# Altium PCB CC08-1(W305A)-V1.3.PcbDoc
Units mm, origin at the board's own origin, x right, y up, seen from the top; angles counter-clockwise.
Board outline 31.4 x 124 mm, 2 copper layers (Top Layer, Bottom Layer); 64 components, 39 nets, 237 pads, 0 vias.
Unrouted connection lines stored in the file: 4.
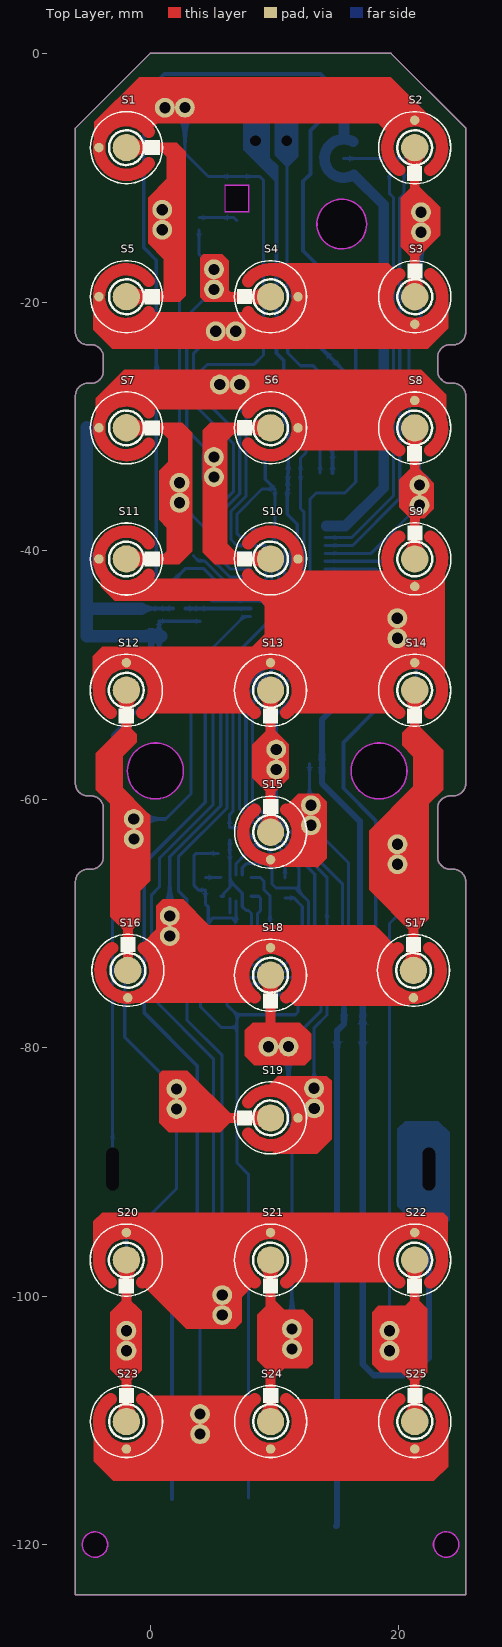
[diagram p0: Top Layer view]
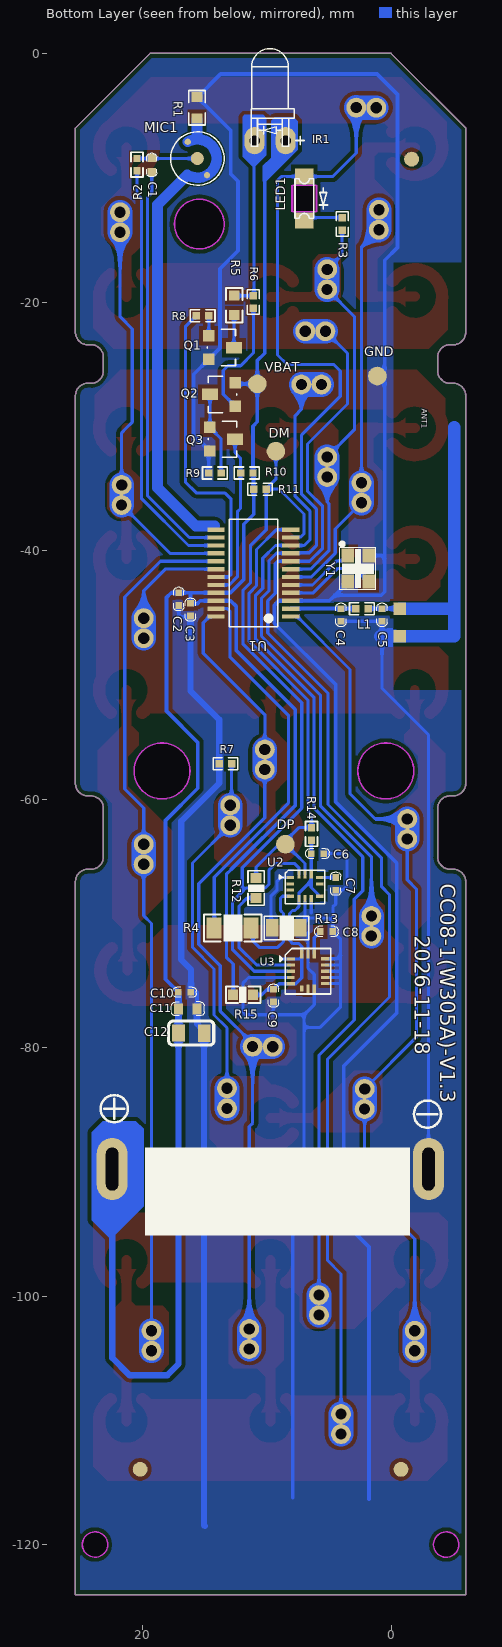
[diagram p1: Bottom Layer view, seen from below]

## Layer stack, top to bottom
Top Solder: solder mask 0.0102, Solder Resist, Dk 3.5
Top Layer: signal copper 0.0356
Dielectric 1: dielectric 0.32, FR-4, Dk 4.8
Bottom Layer: signal copper 0.0356
Bottom Solder: solder mask 0.0102, Solder Resist, Dk 3.5

## Board outline
-6,-66.64 cw(c-5,-66.64) -5,-65.64 -4.75,-65.64 ccw(c-4.75,-64.64) -3.75,-64.64 -3.75,-60.74 ccw(c-4.75,-60.74) -4.75,-59.74 -5,-59.74 cw(c-5,-58.74) -6,-58.74 -6,-27.54 cw(c-5,-27.54) -5,-26.54 -4.75,-26.54 ccw(c-4.75,-25.54) -3.75,-25.54 -3.75,-24.44 ccw(c-4.75,-24.44) -4.75,-23.44 -5,-23.44 cw(c-5,-22.44) -6,-22.44 -6,-6 0,0 19.4,0 25.4,-6 25.4,-22.44 cw(c24.4,-22.44) 24.4,-23.44 24.15,-23.44 ccw(c24.15,-24.44) 23.15,-24.44 23.15,-25.54 ccw(c24.15,-25.54) 24.15,-26.54 24.4,-26.54 cw(c24.4,-27.54) 25.4,-27.54 25.4,-58.74 cw(c24.4,-58.74) 24.4,-59.74 24.15,-59.74 ccw(c24.15,-60.74) 23.15,-60.74 23.15,-64.64 ccw(c24.15,-64.64) 24.15,-65.64 24.4,-65.64 cw(c24.4,-66.64) 25.4,-66.64 25.4,-124 -6,-124
cut-out: 22.806,-119.973 ccw(c23.826,-119.973) 23.826,-120.993 ccw(c23.826,-119.973) 24.846,-119.973 ccw(c23.826,-119.973) 23.826,-118.953 ccw(c23.826,-119.973)
cut-out: -5.446,-119.979 ccw(c-4.426,-119.979) -4.426,-120.999 ccw(c-4.426,-119.979) -3.406,-119.979 ccw(c-4.426,-119.979) -4.426,-118.959 ccw(c-4.426,-119.979)
cut-out: 16.18,-57.73 ccw(c18.43,-57.73) 18.43,-59.98 ccw(c18.43,-57.73) 20.68,-57.73 ccw(c18.43,-57.73) 18.43,-55.48 ccw(c18.43,-57.73)
cut-out: 0.43,-59.98 cw(c0.43,-57.73) -1.82,-57.73 cw(c0.43,-57.73) 0.43,-55.48 cw(c0.43,-57.73) 2.68,-57.73 cw(c0.43,-57.73)
cut-out: 15.43,-15.73 cw(c15.43,-13.73) 13.43,-13.73 cw(c15.43,-13.73) 15.43,-11.73 cw(c15.43,-13.73) 17.43,-13.73 cw(c15.43,-13.73)
cut-out: 5.999,-12.72 7.999,-12.72 7.999,-10.62 5.999,-10.62

## Design rules (kind name [scope] priority, off if disabled: settings)
Clearance Clearance_1 [All vs InNet('GND')] p1: gap=0.305 ignorepadtopadclearanceinfootprint=FALSE
Clearance [All] p2: gap=0.25 ignorepadtopadclearanceinfootprint=FALSE
PolygonConnect [All] p1: connectstyle=Direct reliefconductorwidth=0.254 reliefentries=4 polygonreliefangle="90 Angle" airgapwidth=0.254
RoutingVias [All] p1: holewidth=0.711 width=1.27 viastyle="Through Hole" minholewidth=0.711 minwidth=1.27 maxholewidth=0.711 maxwidth=1.27
SolderMaskExpansion [All] p1: expansion=0.102 istentingtop=FALSE
Width [All] p1: maxlimit=2 minlimit=0.1 preferedwidth=0.254
30 further rules are at their usual default settings.

## Components (designator, comment, footprint, x,y, rotation, side; value= is the part's Value field where it differs from the comment)
ANT1 "ANTENA" ANT_08 -0.688,-44.669 r180 bottom
C1 "4.7uF" 0402C#1 19.255,-8.446 r270 bottom
C2 "105" 0402C#2 17.091,-44.435 r90 bottom
C3 "105" 0402C#2 16.141,-45.286 r90 bottom
C4 "NC" 0402C#2 4.029,-45.705 r90 bottom
C5 "NC" 0402C#2 0.727,-45.705 r90 bottom
C6 "104" 0402C#2 6.446,-64.385 r180 bottom
C7 "104" 0402C#2 4.463,-66.287 r270 bottom
C8 "104" 0402C#2 5.719,-70.655 r180 bottom
C9 "104" 0402C#2 9.47,-75.286 r270 bottom
C10 "104" 0402C#2 17.143,-75.542 r180 bottom
C11 "22uF" 0603C 16.364,-76.883 r0 bottom
C12 "22uF" C0805 17.107,-78.816 r180 bottom
IR1 "IR_LED" LED 9.77,-6.985 r0 bottom
L1 "0R" 0402 2.357,-44.669 r180 bottom
LED1 "1206红色反贴" "PCBCOMPONENT_1 - DUPLICATE1" 6.985,-9.906 r270 top
MIC1 "4013" 4013 15.582,-8.468 r240 bottom
Q1 "S8050" SOT-23 14.679,-22.713 r270 bottom
Q2 "S8550" SOT-23 12.541,-28.395 r90 bottom
Q3 "S8050" SOT-23 14.59,-30.085 r270 bottom
R1 "0R" R0603#1 15.618,-4.375 r270 bottom
R2 "2K" 0402R 20.447,-8.953 r270 bottom
R3 "1K" 0402R 3.937,-13.716 r270 bottom
R4 "0R" R1206 12.754,-70.362 r180 bottom
R5 "3.3R" R0603#2 12.627,-20.265 r90 bottom
R6 "10K" 0402 11.079,-19.999 r270 bottom
R7 "470R" 0402 13.335,-57.15 r180 bottom
R8 "1K" 0402 15.163,-21.098 r180 bottom
R9 "1K" 0402 14.184,-33.759 r180 bottom
R10 "10K" 0402 11.614,-33.759 r0 bottom
R11 "4.7K" 0402 10.549,-35.052 r0 bottom
R12 "0R" R0603#2 10.867,-67.149 r270 bottom
R13 "0R" 0805R 8.425,-70.362 r180 bottom
R14 "4.7K" 0402R 6.405,-62.79 r270 bottom
R15 "0R" R0603#2 11.905,-75.739 r180 bottom
S1 "SW-PB" KINGFIGER_QIXIN2#1 -1.904,-7.572 r0 top
S2 "SW-PB" KINGFIGER_QIXIN2#2 21.3,-7.58 r270 top
S3 "SW-PB" KINGFIGER_QIXIN2#3 21.3,-19.58 r90 top
S4 "SW-PB" KINGFIGER_QIXIN2#4 9.7,-19.58 r180 top
S5 "SW-PB" KINGFIGER_QIXIN2#2 -1.904,-19.572 r0 top
S6 "SW-PB" KINGFIGER_QIXIN2#1 9.7,-30.13 r180 top
S7 "SW-PB" KINGFIGER_QIXIN2#1 -1.904,-30.122 r0 top
S8 "SW-PB" KINGFIGER_QIXIN2#2 21.3,-30.13 r270 top
S9 "SW-PB" KINGFIGER_QIXIN2#2 21.3,-40.68 r90 top
S10 "SW-PB" KINGFIGER_QIXIN2#1 9.7,-40.68 r180 top
S11 "SW-PB" KINGFIGER_QIXIN2#1 -1.904,-40.672 r0 top
S12 "SW-PB" KINGFIGER_QIXIN2#1 -1.9,-51.23 r270 top
S13 "SW-PB" KINGFIGER_QIXIN2#2 9.7,-51.23 r270 top
S14 "SW-PB" KINGFIGER_QIXIN2#2 21.3,-51.23 r270 top
S15 "SW-PB" KINGFIGER_QIXIN2#1 9.7,-62.667 r90 top
S16 "SW-PB" KINGFIGER_QIXIN2#1 -1.787,-73.78 r90 top
S17 "SW-PB" KINGFIGER_QIXIN2#2 21.193,-73.78 r90 top
S18 "SW-PB" KINGFIGER_QIXIN2#1 9.7,-74.16 r270 top
S19 "SW-PB" KINGFIGER_QIXIN2#1 9.7,-85.653 r180 top
S20 "SW-PB" KINGFIGER_QIXIN2#1 -1.9,-97.08 r270 top
S21 "SW-PB" KINGFIGER_QIXIN2#1 9.7,-97.08 r270 top
S22 "SW-PB" KINGFIGER_QIXIN2#1 21.3,-97.08 r270 top
S23 "SW-PB" KINGFIGER_QIXIN2#1 -1.9,-110.08 r90 top
S24 "SW-PB" KINGFIGER_QIXIN2#1 9.7,-110.08 r90 top
S25 "SW-PB" KINGFIGER_QIXIN2#1 21.3,-110.08 r90 top
U1 "W305A" SSOP24-0.635 7.215,-32.535 r90 bottom
U2 "LSM6DS3TR" BMI-160 8.425,-68.311 r180 bottom
U3 ".B" IC2530 5.293,-73.846 r180 bottom
Y1 "24MHZ_12PF_10ppm" 12MHZ_MINI_3225 3.465,-40.417 r180 bottom

## Footprints (in the part's own frame and the unit in brackets; to place one, negate y for a bottom-side part, rotate by r counter-clockwise, add the part's x,y. Pads: shape width x height; smd on the part's side, far side on the other; paste and mask are expansions set on the pad)
12MHZ_MINI_3225 [mil]
  rect 40x45 smd: 1(-1.45,0.52) 2(-1.45,-81.68) 3(65.05,-81.68) 4(65.05,0.62)
  silkscreen extent -26,-108 88,38
0402 [mm]
  rect 0.6x0.6 smd: 1(-0.5,0) 2(0.5,0)
  silkscreen extent -0.99,-0.48 0.99,0.48
0402C#1 [mil]
  rect 26x26 smd: 1(-0.91,-0.28) 2(43.09,-0.28)
  silkscreen extent -16,-16 58,16
0402C#2 [mil]
  rect 21x21 smd: 1(0.77,0.16) 2(40.78,0.16)
  silkscreen extent -16,-16 58,16
0402R [mm]
  rect 0.6x0.6 smd: 1(-0.5,0) 2(0.5,0)
  silkscreen extent -0.99,-0.48 0.99,0.48
0603C [mm]
  rect 0.7x0.9 smd: 1(-0.75,0) 2(0.75,0)
  silkscreen extent -1.33,-0.57 1.31,0.56
0805R [mm]
  rect 1x1.4 smd: 1(-1.126,0) 2(1.125,0)
  silkscreen extent -1.77,-0.96 1.79,0.95
4013 [mm]
  round 1.05 smd: 1(-0.016,0.002)
  round 0.5 smd: 2(-1.566,0.002) 2(1.534,0.002)
  Top Layer lines w0.85: -0.763,1.361 ccw(c-0.016,0.002) -1.42,0.661 ccw(c-0.016,0.002) -1.566,0.002 ; 1.534,0.002 cw(c-0.016,0.002) 1.171,-0.994 cw(c-0.016,0.002) 0.73,-1.356
  silkscreen extent -2.17,-2.15 2.13,2.15
ANT_08 [mm]
  rect 1x1 smd: 1(0,0) 2(0,-2.21)
  Top Layer lines w1: 4.394,14.605 4.394,0 ; 0,-2.21 4.394,-2.21 4.394,0 ; 0,0 4.394,0
BMI-160 [mm]
  rect 0.6x0.25 smd: 1(0.297,2.002) 2(0.297,1.499) 3(0.297,1.001) 4(0.297,0.498) 8(2.697,0.5) 10(2.697,1.499) 11(2.697,2.002)
  rect 0.25x0.6 smd: 5(1.001,0.292) 6(1.499,0.292) 7(1.999,0.292) 12(1.999,2.215) 13(1.499,2.215) 14(1.001,2.215)
  rect 0.6x0.25 on Bottom Overlay: 9(2.697,1.001)
  silkscreen extent -0.59,-0.09 3.1,2.61
C0805 [mil]
  rect 40x55 smd: 1(0,0) 2(81.1,-0.3)
  silkscreen extent -31,-38 112,38
IC2530 [mm]
  rect 0.7x0.25 smd: 1(-2.79,0.995) 2(-2.79,0.495) 3(-2.79,-0.005) 5(-2.79,-1.005) 9(0,-1) 10(0,-0.5) 11(0,0) 12(0,0.5) 13(0,1)
  rect 0.6x0.25 smd: 4(-2.79,-0.505)
  rect 0.25x0.5 smd: 6(-1.895,-1.4)
  rect 0.25x0.7 smd: 7(-1.395,-1.4) 8(-0.895,-1.4) 14(-0.895,1.39) 15(-1.395,1.39) 16(-1.895,1.39)
  silkscreen extent -3.67,-1.83 0.43,1.83
KINGFIGER_QIXIN2#1 [mm]
  round 2.2 smd: 1(0,0)
  round 0.762 smd: 2(-2.206,-0.003)
  Top Layer lines w1: 1.802,-1.262 cw(c0,0) 1.802,1.262
  silkscreen extent -2.89,-2.9 2.91,2.89
KINGFIGER_QIXIN2#2 [mm]
  round 2.2 smd: 1(0,0)
  round 0.762 smd: 2(-2.206,-0.003)
  Top Layer lines w1: 1.802,-1.262 cw(c0,0) -2.131,-0.547 cw(c0,0) 1.802,1.262
  silkscreen extent -2.89,-2.91 2.9,2.89
KINGFIGER_QIXIN2#3 [mm]
  round 2.2 smd: 1(0,0)
  round 0.762 smd: 2(-2.206,-0.003)
  Top Layer lines w1: 1.802,1.262 ccw(c0,0) -2.079,0.72 ccw(c0,0) -2.185,0.255 ccw(c0,0) -2.2,-0.003 ccw(c0,0) 1.802,-1.262
  silkscreen extent -2.89,-2.91 2.9,2.89
KINGFIGER_QIXIN2#4 [mm]
  round 2.2 smd: 1(0,0)
  round 0.762 smd: 2(-2.206,-0.003)
  Top Layer lines w1: 1.802,1.262 ccw(c0,0) 0.255,2.185 ccw(c0,0) -0.255,2.185 ccw(c0,0) 1.802,-1.262
  silkscreen extent -2.89,-2.9 2.91,2.89
LED [mm]
  oval 1.6x2.2 / inner round 1.4 / far side round 0 hole 0.85: 1(-1.284,0.033) 2(1.216,0.033)
  silkscreen extent -2.78,-7.38 1.48,0.47
"PCBCOMPONENT_1 - DUPLICATE1" [mm]
  rect 1.295x1.5 smd far side: 1(0,0) 2(3.539,0)
  Keep-Out Layer board cut-out: 0.688,-0.945 0.688,0.945 2.851,0.945 2.851,-0.945
  Keep-Out Layer lines w0.076: 2.851,-0.945 0.688,-0.945 0.688,0.945 2.851,0.945 2.851,-0.945
R0603#1 [mm]
  rect 0.806x0.864 smd paste-100 mask+0.051: 1(-0.853,0) 2(0.853,0)
  silkscreen extent -1.39,-0.66 1.39,0.66
R0603#2 [mm]
  rect 0.806x0.864 smd paste-100 mask+0.051: 1(-0.799,0) 2(0.798,0)
  silkscreen extent -1.39,-0.66 1.39,0.66
R1206 [mm]
  rect 1.208x1.701 smd paste-100 mask+0.051: 1(-1.479,0) 2(1.479,0)
  silkscreen extent -2.31,-1.08 2.31,1.08
SOT-23 [mil]
  rect 36x36 smd: 1(0,0) 2(74.94,0.05)
  rect 36x50 smd: 3(38,80)
  silkscreen extent -20,-5 95,85
SSOP24-0.635 [mm]
  rect 0.35x1.4 smd: 1.PA0(-12.769,0.872) 2.BTRF(-12.134,0.872) 3.VSS(-11.499,0.872) 4.XOSCI(-10.864,0.872) 5.XOSCO(-10.229,0.872) 6.PA15(-9.594,0.872) 7.PA14(-8.959,0.872) 8.PA13(-8.324,0.872) 9.PA12(-7.689,0.872) 10.PA11(-7.054,0.872) 11.DM(-6.419,0.872) 12.DP(-5.784,0.872) 13.AVSS(-5.784,6.872) 14.PA8(-6.419,6.872) 15.PA7(-7.054,6.872) 16.PA6(-7.689,6.872) 17.PA5(-8.324,6.872) 18.PA2(-8.959,6.872) 19.PB6(-9.594,6.872) 20.PB5(-10.229,6.872) 21.VPWR(-10.864,6.872) 22.IOVDD(-11.499,6.872) 23.PB2(-12.134,6.872) 24.PB1(-12.769,6.872)
  silkscreen extent -13.61,1.92 -4.95,5.82

## Part data
ANT1: "50欧天线"

## Free pads (board coordinates)
  round 1.2 smd far side: 0(-1.651,-8.509) 0(-0.793,-113.925) 0(20.193,-113.919)
  round 1.5 smd far side: 1(1.112,-25.956) 1(8.509,-63.627) 1(9.271,-32.004) 1(10.764,-26.591)
  round 0 / inner oval 2.2x4.5 / far side oval 2.5x5 hole 1 slot 3.45 at 90 deg: 21(-3.008,-89.763) 21(22.442,-89.763)
  round 1.6 hole 0.9: 265(-1.898,-104.385) 265(-1.299,-63.21) 265(0.987,-14.188) 265(1.592,-71.016) 265(2.13,-84.927) 265(2.384,-36.159) 265(2.806,-4.361) 265(4.035,-111.089) 265(5.145,-34.078) 265(5.147,-18.983) 265(5.811,-101.516) 265(6.901,-22.35) 265(7.223,-26.639) 265(10.165,-57.618) 265(11.14,-79.912) 265(11.419,-104.242) 265(12.943,-60.496) 265(13.203,-83.269) 265(19.273,-102.774) 265(19.904,-47.05) 265(19.906,-63.632) 265(21.679,-34.726) 265(21.806,-12.774) 266(-1.902,-102.774) 266(-1.303,-61.6) 266(0.983,-12.578) 266(1.196,-4.366) 266(1.587,-69.406) 266(2.126,-83.317) 266(2.38,-34.549) 266(4.031,-109.479) 266(5.14,-32.468) 266(5.143,-17.372) 266(5.291,-22.354) 266(5.612,-26.644) 266(5.806,-99.906) 266(9.53,-79.916) 266(10.16,-56.007) 266(11.415,-102.631) 266(12.948,-62.107) 266(13.208,-84.879) 266(19.278,-104.385) 266(19.899,-45.44) 266(19.91,-65.242) 266(21.683,-36.337) 266(21.81,-14.385)

## Nets (pads, with @x,y where several pads share a name; then routed paths per layer and width w, separated by ;. In a path a pad name is that pad's centre, name@x,y a point inside that pad or via, vN(x,y) a via of type N, cw(c..) or ccw(c..) an arc to the next point about the centre after c; other vN are vias at no path point)
AGND: MIC1.2 R1.2 U1.13.AVSS | length 36.9
  Bottom Layer w0.85: 14.193,-38.021 15.717,-38.021 18.796,-34.942 18.796,-12.183 16.392,-9.779 ; 14.785,-7.127 ccw(c15.588,-8.453) MIC1.2@14.813,-9.796 ; R1.2@15.618,-5.293 15.618,-6.807 15.72,-6.909
ANT: C4.2 L1.1 U1.2.BTRF | length 5.2
  Bottom Layer w0.3: L1.1 U1.2.BTRF
C0: pad.265@19.904,-47.05 pad.266@19.899,-45.44 S9.2 S10.2 S11.2 S12.2 S13.2 S14.2 U1.18.PA2 | length 64.6
  Top Layer w1: -1.936,-43.228 20.954,-43.228 S9.2@21.302,-42.88 ; S12.2 S13.2 S13.2@9.881,-49.023 ; S13.2@9.868,-49.036 S13.2@9.881,-49.023 ; S13.2@10.002,-48.902 S13.2@9.881,-49.023 ; 18.765,-47.843 18.765,-49.023 ; 18.89,-46.233 18.89,-43.233 ; 18.894,-47.843 18.894,-46.237 ; S14.2@21.414,-49.033 21.405,-49.023 S14.2 18.765,-49.023 ; S13.2@9.881,-49.023 18.765,-49.023
  Bottom Layer w0.25: U1.18.PA2 18.174,-41.494 19.899,-43.219 19.899,-45.44 19.899,-47.046 pad.265@19.904,-47.05
  Bottom Layer w2: pad.265@19.899,-47.05 pad.266@19.899,-45.44
C1: LED1.1 pad.265@1.592,-71.016 pad.265@2.806,-4.361 pad.266@1.196,-4.366 pad.266@1.587,-69.406 S1.2 S2.2 S16.2 S17.2 S18.2 U1.9.PA12 | length 128.8
  Top Layer w1: -1.682,-5.128 20.431,-5.128 20.753,-5.449 ; -0.031,-71.93 0.223,-71.676 17.531,-71.676 19.068,-73.213
  Bottom Layer w0.25: pad.266@1.587,-69.406 1.587,-64.634 5.693,-60.528 5.693,-51.621 10.426,-46.889 10.426,-43.836 9.826,-43.236 9.826,-40.814 9.223,-40.211 8.074,-40.211 8.037,-40.174 6.583,-40.174 6.012,-39.603 6.012,-36.643 7.225,-35.43 7.225,-30.726 4.095,-27.596 4.095,-25.556 4.632,-25.019 8.382,-25.019 9.136,-24.265 9.136,-10.207 8.835,-9.906 LED1.1 4.699,-9.906 2.806,-8.013 pad.265@2.806,-4.361
  Bottom Layer w2: pad.266@1.196,-4.366 2.802,-4.366 pad.265@2.806,-4.361 ; pad.265@1.587,-71.016 pad.266@1.587,-69.406
C2: pad.265@5.811,-101.516 pad.265@7.223,-26.639 pad.266@5.612,-26.644 pad.266@5.806,-99.906 S6.2 S7.2 S8.2 S20.2 S21.2 S22.2 U1.10.PA11 | length 131.4
  Top Layer w1: S20.2 S21.2 S22.2 ; -1.809,-27.861 20.87,-27.861 20.87,-27.972
  Bottom Layer w0.25: pad.265@5.809,-101.514 pad.265@5.811,-101.516 ; pad.266@5.809,-99.908 5.806,-99.906 5.806,-80.609 2.963,-77.765 2.963,-68.053 2.286,-67.376 2.286,-64.643 6.193,-60.736 6.193,-51.828 10.926,-47.096 10.926,-43.629 10.326,-43.028 10.326,-40.606 9.306,-39.587 U1.10.PA11@8.094,-39.587 ; pad.265@7.223,-26.639 7.223,-26.644 7.223,-28.638 7.725,-29.14 7.725,-35.637 6.512,-36.85 6.512,-39.108 6.994,-39.589 U1.10.PA11
  Bottom Layer w2: pad.266@5.612,-26.644 pad.265@7.223,-26.644 ; pad.265@5.809,-101.514 pad.266@5.809,-99.908
C3: pad.265@4.035,-111.089 pad.265@6.901,-22.35 pad.266@4.031,-109.479 pad.266@5.291,-22.354 S3.2 S4.2 S5.2 S23.2 S24.2 S25.2 U1.8.PA13 | length 149.9
  Top Layer w1: -2.032,-21.971 -1.488,-22.515 6.985,-22.515 7.714,-21.786 S3.2 S3.2@21.302,-21.78 ; S23.2 S24.2 S25.2
  Bottom Layer w0.25: pad.266@4.033,-109.479 4.033,-98.202 5.124,-97.111 5.124,-80.918 0.127,-75.922 0.127,-67.691 0.762,-67.056 0.762,-64.753 5.08,-60.435 5.08,-51.479 9.926,-46.633 9.926,-44.043 9.326,-43.443 9.326,-41.042 9.14,-40.857 U1.8.PA13@8.09,-40.857 ; pad.266@5.293,-22.352 5.291,-22.354 3.513,-24.132 3.513,-28.212 6.725,-31.424 6.725,-35.223 5.512,-36.436 5.512,-39.81 6.561,-40.859 U1.8.PA13 ; pad.265@6.899,-22.352 pad.265@6.901,-22.35
  Bottom Layer w2: pad.265@4.031,-111.089 pad.266@4.031,-109.479 ; pad.266@5.293,-22.352 pad.265@6.899,-22.352
C4: 
C5: 
GND: ANT1.2 C2.1 C3.1 C4.1 C5.1 C6.2 C7.2 C8.2 C9.2 C10.2 C11.1 C12.2 pad.1@1.112,-25.956 pad.21@-3.008,-89.763 Q1.2 Q3.2 R1.1 R7.1 R9.1 R13.1 R13.2 U1.3.VSS U2.1 U2.6 U2.7 U3.4 U3.8 U3.9 U3.10 U3.11 U3.12 U3.13 U3.15 Y1.2 Y1.4 | length 405.2
  Bottom Layer w0.25: pad.21@-3.008,-89.763 -3.008,-54.824 0.731,-51.085 0.731,-46.879 C5.1 C4.1 ; 4.148,-74.346 U3.10 ; 4.148,-73.846 U3.11 ; 4.148,-73.346 U3.12 ; U3.9 4.148,-74.846 4.064,-74.762 ; U3.13 4.359,-72.846 4.064,-72.551 ; C6.2@5.526,-64.362 3.71,-64.362 3.552,-64.52 3.552,-66.96 3.914,-67.322 C7.2 4.459,-68.446 4.684,-68.671 4.684,-69.948 ; 6.426,-69.163 U2.7 ; 6.688,-70.726 6.688,-72.02 6.688,-73.601 6.188,-74.101 U3.8 6.188,-76.531 7.001,-77.344 ; U2.6@6.926,-68.194 6.926,-68.444 6.924,-68.444 6.924,-69.153 6.927,-69.155 6.927,-69.864 6.614,-69.551 5.081,-69.551 4.684,-69.948 ; 7.915,-116.217 7.915,-90.178 7.001,-89.263 7.001,-78.359 ; U3.4 11.473,-74.351 11.905,-74.783 11.905,-77.122 11.684,-77.344 7.001,-77.344 ; U2.1 8.883,-66.309 9.172,-66.598 9.172,-67.296 9.652,-67.776 R13.1@9.652,-69.84 ; C9.2 9.466,-76.952 9.836,-77.322 ; 4.064,-74.762 4.064,-72.551 ; 4.064,-74.762 4.064,-76.708 5.715,-78.359 7.001,-78.359 ; 4.064,-72.551 4.064,-71.271 C8.2 4.684,-69.948 ; 7.001,-78.359 7.001,-77.344
  Bottom Layer w0.3: 1.778,-116.332 1.778,-96.024 3.81,-93.992 3.81,-81.465 -0.453,-77.202 -0.453,-65.148 4.445,-60.25 4.445,-50.8 9.401,-45.844 9.401,-44.418 9.022,-44.039 8.092,-44.039 U1.3.VSS 4.981,-44.034 4.54,-43.593 ; Y1.4 0.747,-40.401 0.508,-40.64 ; Y1.2 3.502,-42.555 4.54,-43.593 ; R9.1 14.684,-32.084 Q3.2 15.875,-30.702 15.875,-25.814 Q1.2 13.767,-23.706 13.767,-17.323 12.319,-15.875 12.319,-10.287 12.912,-9.694 12.912,-6.2 R1.1@15.589,-3.522 ; C11.1 15.614,-75.538 C10.2 ; R1.1 R1.1@15.589,-3.522 ; C3.1 16.218,-45.339 16.891,-45.339 17.095,-45.135 C2.1 ; 0.508,-40.64 0.508,-16.637 -0.508,-15.621 -0.508,-3.302 1.143,-1.651 13.718,-1.651 R1.1@15.589,-3.522 ; 0.508,-40.64 0.508,-43.307 0.794,-43.593 4.54,-43.593
  Bottom Layer w0.5: 14.986,-118.491 15.047,-118.43 C12.2 15.047,-78.633 15.305,-78.375 15.321,-78.375 15.614,-78.082 C11.1 ; C10.2 16.107,-73.697 16.891,-72.913 16.891,-61.767 13.835,-58.711 R7.1 13.835,-53.602 16.145,-51.292 C3.1
  Bottom Layer w1: ANT1.2 0.731,-46.879 0.889,-46.879
INT: R4.1 R4.2 U1.23.PB2 U2.4 | length 39.5
  Bottom Layer w0.25: U2.4 8.744,-67.813 8.89,-67.959 8.89,-68.975 8.664,-69.201 8.664,-71.464 9.131,-71.93 10.62,-71.93 11.109,-71.441 11.109,-70.528 R4.2 ; U1.23.PB2 13.173,-44.669 12.976,-44.866 12.976,-48.556 8.243,-53.288 8.243,-60.286 14.232,-66.275 R4.1
IR_1: Q1.3 R5.1 | length 2.6
  Bottom Layer w0.25: R5.1 12.647,-21.084 Q1.3
IR_LED2: IR1.2 R5.2 R6.1 | length 13.6
  Bottom Layer w0.25: IR1.2@10.992,-7.521 11.036,-7.565 11.036,-19.455 R6.1 12.593,-19.499 R5.2 R5.2
IR_RECE: Q3.3 R10.2 U1.20.PB5 | length 13.3
  Bottom Layer w0.25: Q3.3 12.558,-32.117 12.114,-32.56 R10.2 12.114,-36.611 12.376,-36.872 12.376,-42.113 13.027,-42.764 U1.20.PB5
IR_SEND: R8.1 U1.19.PB6 | length 25.3
  Bottom Layer w0.25: U1.19.PB6 13.099,-42.129 12.876,-41.905 12.876,-35.874 13.396,-35.354 15.688,-35.354 16.558,-34.484 16.558,-21.993 R8.1
IREF: Q1.1 R8.2 | length 1.6
  Bottom Layer w0.25: R8.2 14.663,-22.697 Q1.1
LEDG: 
LEDG-1: 
LEDR: 
LEDR-1: LED1.2 R3.1 | length 3.1
  Bottom Layer w0.25: R3.1 6.756,-13.216 LED1.2
MIC_BIAS: R2.2 U1.15.PA7 | length 34.1
  Bottom Layer w0.25: U1.15.PA7 16.308,-39.589 20.096,-35.801 20.096,-11.654 20.447,-11.303 R2.2
MIC_BIAS_1: C1.1 MIC1.1 R2.1 | length 4.9
  Bottom Layer w0.25: MIC1.1 R2.1
MIC_IN: C1.2 U1.14.PA8 | length 33.1
  Bottom Layer w0.25: U1.14.PA8 16.236,-38.954 19.596,-35.594 19.596,-11.595 19.262,-11.261 C1.2
NetANT1_1: ANT1.1 C5.2 L1.2 | length 2.5
  Bottom Layer w0.3: ANT1.1 C5.2 L1.2
Q1-1: Q2.1 R6.2 | length 9.9
  Bottom Layer w0.25: R6.2 11.079,-24.098 12.108,-25.126 13.122,-25.126 13.509,-25.513 13.509,-27.427 Q2.1
Q1-3: Q2.3 Q3.1 R9.2 | length 6.8
  Bottom Layer w0.25: R9.2 13.684,-30.991 Q3.1 14.573,-30.085 Q2.3 Q2.3@14.524,-27.479
R0: pad.265@19.273,-102.774 pad.265@19.906,-63.632 pad.266@19.91,-65.242 pad.266@19.278,-104.385 S14.1 S17.1 S22.1 S25.1 U1.17.PA5 | length 112.2
  Top Layer w0.8: 19.246,-103.58 21.3,-103.58 ; 19.273,-64.437 21.193,-64.437 ; S17.1 21.193,-64.437 ; S25.1 21.3,-103.58 ; S22.1 21.3,-103.58 ; S14.1 21.3,-54.907 22.378,-55.985 22.378,-59.096 21.193,-60.281 21.193,-64.437
  Bottom Layer w0.25: U1.17.PA5 18.555,-40.859 21.432,-43.736 21.432,-59.182 19.906,-60.708 19.906,-63.632 pad.265@19.908,-63.634 ; pad.265@19.273,-102.774 pad.265@19.275,-102.777 ; pad.266@19.278,-104.385 19.275,-104.383 pad.265@19.275,-102.777 ; pad.266@19.906,-65.242 19.906,-69.375 19.275,-70.006 19.275,-79.502 19.275,-102.774 pad.265@19.275,-102.777 ; pad.266@19.908,-65.24 pad.266@19.91,-65.242
  Bottom Layer w2: pad.266@19.275,-104.385 pad.265@19.275,-102.777 ; pad.266@19.908,-65.24 pad.265@19.908,-63.634
R1: pad.265@21.679,-34.726 pad.265@21.806,-12.774 pad.266@21.81,-14.385 pad.266@21.683,-36.337 S2.1 S3.1 S8.1 S9.1 U1.16.PA6 | length 56.1
  Top Layer w0.8: S9.1 S8.1 ; S3.1 S2.1
  Bottom Layer w0.25: U1.16.PA6 17.796,-40.224 pad.266@21.683,-36.337 ; pad.265@21.683,-34.726 21.683,-30.525 21.298,-30.14 20.828,-29.67 20.828,-22.166 21.806,-21.189 pad.266@21.806,-14.385
  Bottom Layer w2: pad.266@21.679,-36.337 pad.265@21.679,-34.726 ; pad.266@21.806,-14.385 pad.265@21.806,-12.774
R2: pad.265@2.13,-84.927 pad.265@-1.299,-63.21 pad.265@-1.898,-104.385 pad.266@2.126,-83.317 pad.266@-1.303,-61.6 pad.266@-1.902,-102.774 S12.1 S16.1 S19.1 S20.1 S23.1 U1.1.PA0 | length 114.3
  Top Layer w0.8: S23.1 S20.1 ; S12.1 -1.9,-55.13 -3.333,-56.563 -3.333,-58.722 -1.787,-60.268 S16.1 ; pad.265@2.001,-84.757 2.103,-84.757 2.999,-85.653 S19.1
  Bottom Layer w0.25: pad.266@-1.902,-102.774 -1.902,-95.391 2.128,-91.361 pad.265@2.128,-84.927 ; pad.266@-1.303,-61.6 1.265,-61.6 3.302,-59.563 3.302,-49.564 7.562,-45.304 U1.1.PA0 ; -0.468,-62.952 -1.04,-62.952 -1.299,-63.21 -1.299,-66.493 -2.032,-67.227 -2.032,-79.159 pad.266@2.023,-83.214 ; pad.266@2.024,-83.213 pad.266@2.128,-83.317
  Bottom Layer w2: pad.265@-1.902,-104.385 pad.266@-1.902,-102.774 ; pad.266@-1.303,-61.6 -1.303,-63.206 pad.265@-1.299,-63.21 ; pad.265@2.126,-84.927 pad.266@2.126,-83.317
R3: pad.265@0.987,-14.188 pad.265@2.384,-36.159 pad.266@0.983,-12.578 pad.266@2.38,-34.549 S1.1 S5.1 S7.1 S11.1 U1.6.PA15 | length 71.6
  Top Layer w0.8: S11.1 1.255,-40.672 2.382,-39.545 2.382,-31.163 1.341,-30.122 S7.1 ; S5.1 1.437,-19.572 2.001,-19.008 2.001,-8.304 1.269,-7.572 S1.1
  Bottom Layer w0.25: pad.265@0.983,-14.188 2.382,-15.588 2.382,-35.354 2.384,-35.356 pad.265@2.384,-35.778 ; pad.265@0.987,-14.188 pad.265@1.001,-14.202 ; pad.265@2.384,-36.159 4.493,-38.268 4.493,-40.206 6.417,-42.129 U1.6.PA15
  Bottom Layer w2: pad.265@0.983,-14.188 pad.266@0.983,-12.578 ; pad.265@2.38,-36.159 pad.266@2.38,-34.549
R4: pad.265@5.145,-34.078 pad.265@5.147,-18.983 pad.266@5.14,-32.468 pad.266@5.143,-17.372 R3.2 S4.1 S6.1 S10.1 U1.7.PA14 | length 56.1
  Top Layer w0.8: pad.266@5.143,-17.372 5.143,-18.979 5.147,-18.983 5.364,-18.983 5.96,-19.58 S4.1 ; S10.1 6.692,-40.68 5.387,-39.375 5.387,-31.145 6.402,-30.13 S6.1
  Bottom Layer w0.25: R3.2 3.937,-16.167 pad.266@5.143,-17.372 ; pad.266@5.14,-32.468 2.958,-30.286 2.958,-21.172 pad.265@5.147,-18.983 ; pad.265@5.145,-34.078 5.145,-36.096 5.012,-36.229 5.012,-40.017 6.489,-41.494 U1.7.PA14
  Bottom Layer w2: pad.265@5.145,-34.078 pad.266@5.145,-32.468 ; pad.265@5.145,-18.983 pad.266@5.145,-17.372
R5: pad.265@10.165,-57.618 pad.265@11.14,-79.912 pad.265@11.419,-104.242 pad.266@9.53,-79.916 pad.266@10.16,-56.007 pad.266@11.415,-102.631 S13.1 S15.1 S18.1 S21.1 S24.1 U1.24.PB1 | length 97.5
  Top Layer w0.8: 9.685,-78.194 9.687,-78.196 ; pad.266@9.687,-79.802 pad.266@9.689,-79.804 ; S24.1 S21.1 ; pad.266@9.7,-79.804 S18.1 ; S15.1 S13.1
  Bottom Layer w0.25: pad.265@10.162,-57.615 10.165,-57.618 10.165,-61.5 15.475,-66.81 15.475,-71.673 13.745,-73.404 13.745,-77.06 11.14,-79.665 11.14,-79.912 11.14,-79.916 11.14,-86.07 11.415,-86.345 pad.266@11.415,-102.631 ; pad.266@10.162,-56.009 10.16,-56.007 10.16,-53.213 15.113,-48.26 15.113,-45.805 14.612,-45.304 U1.24.PB1
  Bottom Layer w2: pad.266@9.53,-79.916 pad.265@11.14,-79.916 ; pad.265@10.162,-57.615 pad.266@10.162,-56.009 ; pad.265@11.415,-104.242 pad.266@11.415,-102.631
REGO: C7.1 U2.11 | length 1.3
  Bottom Layer w0.25: C7.1 4.462,-66.309 U2.11
REGOU: C8.1 U3.14 | length 2
  Bottom Layer w0.25: C8.1 6.188,-71.139 U3.14
RGND: pad.265@12.943,-60.496 pad.265@13.203,-83.269 pad.266@12.948,-62.107 pad.266@13.208,-84.879 R7.2 S15.2 S19.2 | length 31.9
  Top Layer w1: 11.486,-60.762 pad.265@12.955,-60.762 ; 11.557,-61.341 11.74,-61.524
  Bottom Layer w0.25: R7.2 12.835,-60.388 pad.265@12.943,-60.496 ; pad.266@12.948,-62.107 15.982,-65.142 15.982,-71.929 14.245,-73.667 14.245,-77.365 13.208,-78.402 pad.265@13.208,-83.269 ; pad.265@13.203,-83.269 pad.265@13.206,-83.271 ; pad.266@13.206,-84.877 pad.266@13.208,-84.879
  Bottom Layer w1: pad.265@12.943,-60.496 pad.265@12.945,-60.499 ; pad.266@12.945,-62.105 pad.266@12.948,-62.107
  Bottom Layer w2: pad.266@12.945,-62.105 pad.265@12.945,-60.499 ; pad.266@13.206,-84.877 pad.265@13.206,-83.271
SCL: pad.1@8.509,-63.627 R12.1 R12.2 R14.1 U1.12.DP U2.13 U3.2 | length 47.9
  Bottom Layer w0.25: U2.13 6.927,-65.183 7.674,-64.435 7.701,-64.435 pad.1@8.509,-63.627 ; U3.2 10.317,-73.351 10.816,-73.351 12.254,-71.913 12.254,-68.633 11.568,-67.947 R12.2 ; U1.12.DP 9.236,-38.319 10.826,-39.909 10.826,-42.821 11.426,-43.422 11.426,-47.303 6.693,-52.035 6.693,-60.96 6.405,-61.249 R14.1 7.426,-62.29 8.636,-63.5 pad.1@8.509,-63.627 ; R12.1 10.867,-65.477 9.256,-63.866 8.748,-63.866 pad.1@8.509,-63.627
SDA: pad.1@9.271,-32.004 R11.1 U1.11.DM U2.14 U3.3 | length 64.2
  Bottom Layer w0.25: U2.14 7.424,-65.518 7.756,-65.187 9.307,-65.187 9.813,-65.693 9.813,-66.83 10.132,-67.149 11.682,-67.149 11.98,-67.447 ; U1.11.DM 8.037,-38.904 7.267,-38.904 7.012,-38.65 7.012,-37.057 9.017,-35.052 R11.1 ; U3.3@8.308,-73.851 11.023,-73.851 12.754,-72.12 12.754,-68.22 11.98,-67.447 ; pad.1@9.271,-32.004 9.271,-34.274 R11.1 ; R11.1 10.049,-38.322 11.326,-39.599 11.326,-42.614 11.926,-43.215 11.926,-47.51 7.193,-52.243 7.193,-60.72 11.98,-65.507 11.98,-67.447
VBAT: C2.2 C3.2 C6.1 C9.1 C10.1 C11.2 C12.1 IR1.1 pad.1@10.764,-26.591 pad.21@22.442,-89.763 Q2.2 R10.1 R11.2 R14.2 R15.1 R15.2 U1.21.VPWR U1.22.IOVDD U2.5 U2.8 U2.12 U3.1 U3.5 U3.16 | length 191.5
  Bottom Layer w0.25: U2.8 5.903,-67.81 5.903,-67.627 6.426,-67.103 6.426,-66.566 ; R14.2 6.416,-63.301 6.416,-64.37 C6.1 U2.12 6.426,-66.566 ; U3.16 U3.16@7.188,-72.681 ; U3.16@7.188,-72.231 7.188,-71.856 7.416,-71.628 7.904,-71.628 8.164,-71.368 8.164,-69.197 7.929,-68.961 7.732,-68.961 7.424,-68.654 U2.5 7.424,-67.564 6.426,-66.566 ; 8.872,-72.851 U3.1 7.358,-72.851 U3.16@7.188,-72.681 ; R15.2 10.402,-75.739 9.971,-75.308 9.468,-75.308 C9.1 9.012,-74.851 U3.5 7.664,-74.851 7.188,-74.375 U3.16@7.188,-72.681 ; R15.1 12.704,-75.598 12.704,-73.268 13.254,-72.719 13.254,-66.038 12.845,-65.63
  Bottom Layer w0.3: IR1.1@8.492,-7.521 8.492,-7.676 8.867,-8.05 8.867,-8.105 10.17,-9.408 10.17,-24.119 10.764,-24.713 pad.1@10.764,-26.591 ; Q2.2 12.443,-26.591 pad.1@10.764,-26.591 ; 12.845,-65.63 7.718,-60.503 7.718,-52.798 12.451,-48.065 12.451,-44.51 12.927,-44.034 U1.22.IOVDD 15.361,-44.034 15.577,-44.251 C3.2 16.145,-43.479 16.225,-43.399 ; C10.1@17.123,-75.521 17.14,-75.521 17.24,-75.421 17.24,-75.405 18.154,-74.49 18.154,-61.715 15.56,-59.121 15.56,-55.433 18.077,-52.916 18.077,-43.781 17.695,-43.399 16.225,-43.399 ; pad.1@10.764,-26.591 10.764,-29.639 11.114,-29.989 R10.1 11.082,-33.791 11.082,-35.019 11.114,-35.052 11.114,-35.137 11.049,-35.202 11.049,-37.083 11.851,-37.885 11.851,-42.331 12.919,-43.399 U1.21.VPWR 16.225,-43.399
  Bottom Layer w0.5: C10.1@17.123,-75.521 17.114,-75.53 C11.2 17.114,-105.458 18.003,-106.347 21.051,-106.347 22.442,-104.956 pad.21@22.442,-89.763
XTALI: U1.4.XOSCI Y1.3 | length 7.6
  Bottom Layer w0.25: Y1.3 1.813,-42.428 2.196,-42.045 2.259,-42.045 2.873,-41.432 4.284,-41.432 6.251,-43.399 U1.4.XOSCI
XTALO: U1.5.XOSCO Y1.1 | length 5.6
  Bottom Layer w0.25: Y1.1 3.502,-40.442 3.885,-40.825 4.384,-40.825 6.323,-42.764 U1.5.XOSCO
pads on no net: U2.2 U2.3 U2.9 U2.10 U3.6 U3.7

## Polygon pours and split planes (outlines as drawn)
GND on Bottom Layer "NONET_L-01_P-001" (solid, remove dead copper, pour order 0): -7.239,2.54 -7.239,-126.619 27.178,-126.619 27.178,2.54 14.986,2.54

## Keep-outs
Keep-Out Layer:
  circle w0.127: c23.826,-119.973 r1.02
  circle w0.127: c-4.426,-119.979 r1.02
  circle w0.127: c15.43,-13.73 r2
  circle w0.127: c18.43,-57.73 r2.25
  circle w0.127: c0.43,-57.73 r2.25
  lines w0.127: 25.4,-124 25.4,-66.64 ; 25.4,-124 25.4,-66.64 ; 25.4,-124 -6,-124 -6,-66.64 cw(c-5,-66.64) -5,-65.64 -4.75,-65.64 ccw(c-4.75,-64.64) -3.75,-64.64 -3.75,-60.74 ccw(c-4.75,-60.74) -4.75,-59.74 -5,-59.74 cw(c-5,-58.74) -6,-58.74 -6,-27.54 cw(c-5,-27.54) -5,-26.54 -4.75,-26.54 ccw(c-4.75,-25.54) -3.75,-25.54 -3.75,-24.44 ccw(c-4.75,-24.44) -4.75,-23.44 -5,-23.44 cw(c-5,-22.44) -6,-22.44 -6,-6 0,0 19.4,0 25.4,-6 ; 25.4,-66.64 ccw(c24.4,-66.64) 24.4,-65.64 24.15,-65.64 cw(c24.15,-64.64) 23.15,-64.64 23.15,-60.74 cw(c24.15,-60.74) 24.15,-59.74 24.4,-59.74 ccw(c24.4,-58.74) 25.4,-58.74 ; 25.4,-58.74 25.4,-27.54 ; 25.4,-58.74 25.4,-27.54 ; 25.4,-27.54 ccw(c24.4,-27.54) 24.4,-26.54 24.15,-26.54 cw(c24.15,-25.54) 23.15,-25.54 23.15,-24.44 cw(c24.15,-24.44) 24.15,-23.44 24.4,-23.44 ccw(c24.4,-22.44) 25.4,-22.44 ; 25.4,-22.44 25.4,-6 ; 25.4,-22.44 25.4,-6

## Other copper
Top Layer:
  region net C3: -4.571,-19.872 -4.571,-22.226 -3.048,-23.749 22.352,-23.749 23.984,-22.117 23.984,-19.518 22.733,-20.769 22.733,-21.336 22.479,-21.336 22.098,-21.717 20.193,-21.717 19.05,-20.574 19.05,-18.766 20.038,-17.778 19.151,-16.891 9.779,-16.891 11.43,-18.542 11.43,-20.62 11.562,-20.752 10.724,-21.59 8.646,-21.59 7.898,-20.842 0.367,-20.842 -0.381,-21.59 -2.54,-21.59 -3.937,-20.193
  region net RGND: 10.922,-60.579 11.938,-59.563 13.589,-59.563 14.224,-60.198 14.224,-64.77 13.462,-65.532 13.37,-65.44 9.56,-65.44 10.872,-64.129 11.344,-64.129 11.344,-63.967 11.811,-63.5 11.811,-61.714 10.962,-60.864
  region net R2: -2.177,-54.137 -4.349,-56.309 -4.349,-59.23 -3.206,-60.373 -3.206,-69.454 -1.787,-70.873 -0.793,-69.879 -0.793,-67.358 0,-66.565 0,-61.293 -0.412,-60.881 -2.19,-59.103 -2.19,-56.563 -1.047,-55.42 -1.047,-54.785 -1.695,-54.137
  region net C1: -0.596,-71.89 -0.596,-71.589 0.508,-70.485 0.508,-68.58 1.016,-68.072 2.667,-68.072 4.741,-70.146 18.099,-70.146 19.146,-71.192 2.722,-71.192 1.27,-72.644 0.141,-72.644 -0.215,-72.288
  region net RGND: 9.492,-83.091 10.287,-82.296 14.224,-82.296 14.605,-82.677 14.605,-87.376 13.462,-88.519 9.779,-88.519 10.922,-87.376 11.43,-87.376 12.065,-86.741 12.065,-84.963
  region net R5: 12.065,-77.978 12.954,-78.867 12.954,-80.899 12.446,-81.407 8.382,-81.407 7.62,-80.645 7.62,-78.613 8.255,-77.978
  region net R5: 9.906,-100.203 10.795,-101.092 12.319,-101.092 13.081,-101.854 13.081,-105.41 12.7,-105.791 10.795,-105.791 10.033,-106.553 8.636,-105.156 8.636,-101.473
  region net C2: -0.795,-98.9 2.921,-102.616 6.858,-102.616 7.366,-102.108 7.366,-100.076 8.273,-99.169 7.275,-98.171 2.794,-98.171 2.667,-98.298
  region net C1: -4.476,-7.033 -4.476,-5.509 -0.872,-1.905 19.352,-1.905 23.083,-5.636 20.416,-5.636 19.4,-6.652 18.384,-5.636 0.572,-5.636 -0.102,-6.31 -0.903,-5.509 -1.809,-5.509 -2.698,-5.509 -3.587,-6.398
  region net R1: 21.559,-10.589 23.337,-12.367 23.337,-14.636 21.3,-16.673 20.162,-15.535 20.162,-11.625 21.3,-10.487
  region net R3: 1.029,-19.98 2.389,-19.98 2.89,-19.479 2.89,-7.922 2.152,-7.184 0.861,-7.184 0.861,-7.798 1.366,-8.303 1.366,-10.081 -0.158,-11.605 -0.158,-15.288 1.112,-16.558 1.112,-19.098 0.731,-19.479
  region net R4: 4.033,-19.606 4.033,-16.431 4.287,-16.177 5.811,-16.177 6.319,-16.685 6.319,-19.072 6.827,-19.58 6.42,-19.987 4.414,-19.987
  region net C2: -4.349,-29.258 -4.349,-27.734 -2.063,-25.448 21.813,-25.448 23.845,-27.48 23.845,-29.512 22.448,-28.115 19.908,-28.115 19.019,-29.004 19.019,-30.913 20.038,-31.932 11.533,-31.932 11.272,-31.671 11.907,-31.036 11.907,-29.131 10.891,-28.115 8.478,-28.115 7.97,-28.623 -0.031,-28.623 -0.793,-27.861 -2.825,-27.861 -3.587,-28.623
  region net R1: 21.3,-33.037 20.035,-34.302 20.035,-36.508 21.3,-37.773 21.687,-37.386 22.067,-37.386 22.829,-36.624 22.829,-34.566
  region net R4: 6.79,-29.733 4.828,-29.733 4.248,-30.313 4.248,-40.141 5.193,-41.085 7.224,-41.085 7.224,-40.45 6.229,-39.455 6.229,-31.127 7.081,-30.274
  region net R3: 0.748,-41.086 2.365,-41.086 3.398,-40.053 3.398,-30.528 2.593,-29.723 1.028,-29.723 0.604,-30.147 1.45,-30.993 1.45,-32.857 0.731,-33.576 0.731,-37.513 1.366,-38.148 1.366,-40.053 0.731,-40.688
  region net C0: -4.596,-51.164 -4.596,-48.497 -3.834,-47.735 8.231,-47.735 9.247,-46.719 9.247,-44.433 8.866,-44.052 -2.818,-44.052 -3.961,-42.909 -3.961,-41.766 -3.199,-42.528 -0.405,-42.528 -0.151,-42.274 8.231,-42.274 8.485,-42.528 11.025,-42.528 11.914,-41.639 19.28,-41.639 20.376,-42.735 22.756,-42.735 23.725,-41.766 23.725,-50.529 22.328,-49.132 20.296,-49.132 19.407,-50.021 19.407,-52.456 20.045,-53.094 10.969,-53.094 11.66,-52.403 11.66,-50.275 10.771,-49.386 8.8,-49.386 7.723,-50.462 7.723,-52.434 7.785,-52.434 8.445,-53.094 -0.631,-53.094 0.23,-52.233 0.23,-51.164 0.357,-51.037 0.357,-50.402 -0.913,-49.132 -2.818,-49.132 -4.215,-50.529
  region net R5: 9.7,-54.137 8.224,-55.613 8.224,-58.284 9.7,-59.76 11.145,-58.315 11.145,-55.582
  region net R0: 21.432,-54.134 21.67,-54.134 23.591,-56.055 23.591,-59.23 22.448,-60.373 22.448,-69.618 21.193,-70.873 17.622,-67.302 17.622,-62.532 21.193,-58.961 21.193,-56.578 20.289,-55.674 20.289,-54.658 20.81,-54.137 21.3,-54.137
  region net C1: -0.666,-71.803 0.731,-70.406 18.36,-70.406 19.931,-71.978 19.4,-72.509 19.4,-74.47 21.178,-76.248 20.797,-76.629 11.629,-76.629 10.962,-75.962 11.78,-75.144 11.78,-73.327 10.383,-71.93 9.24,-71.93 7.335,-73.835 7.335,-74.859 8.438,-75.962 8.025,-76.375 -1.301,-76.375 0.096,-74.978 0.096,-72.599 -0.525,-71.978
  region net R2: 3.017,-81.836 6.814,-85.633 5.657,-86.789 1.493,-86.789 0.731,-86.027 0.731,-82.09 0.985,-81.836
  region net R0: 21.3,-99.987 20.528,-100.759 18.384,-100.759 17.876,-101.267 17.876,-105.458 18.511,-106.093 20.22,-106.093 21.3,-107.173 22.321,-106.152 22.321,-101.008
  region net R2: -1.902,-99.987 -3.206,-101.291 -3.206,-105.867 -1.9,-107.173 -0.666,-105.939 -0.666,-101.223
  region net C2: -4.556,-97.023 -4.556,-93.982 -3.841,-93.266 23.591,-93.266 23.972,-93.647 23.972,-96.822 22.067,-94.917 20.543,-94.917 19.4,-96.06 19.4,-98.244 20.038,-98.882 10.962,-98.882 11.907,-97.937 11.907,-95.933 10.764,-94.79 8.732,-94.79 8.732,-94.917 7.335,-96.314 7.335,-97.779 8.438,-98.882 8.212,-99.108 -0.539,-99.108 -0.539,-98.727 0.35,-97.838 0.35,-96.06 -0.793,-94.917 -1.047,-95.171 -2.571,-95.171 -4.349,-96.949
  region net C3: -4.526,-110.159 -4.526,-113.282 -2.952,-114.856 22.829,-114.856 23.98,-113.705 23.98,-110.056 23.21,-110.826 23.21,-111.427 22.575,-112.062 20.035,-112.062 19.146,-111.173 19.146,-109.141 19.175,-109.141 20.038,-108.278 10.962,-108.278 11.78,-109.096 11.78,-111.427 11.018,-112.189 9.113,-112.189 7.716,-110.792 7.716,-109 8.438,-108.278 8.159,-107.998 -0.358,-107.998 -0.638,-108.278 0.223,-109.139 0.223,-110.919 0.35,-111.046 -0.666,-112.062 -2.698,-112.062 -4.349,-110.411 -4.349,-110.157
Bottom Layer:
  rectangle net GND: -0.17,-47.752 0.381,-46.228
  region net IR_LED2: 10.033,-8.196 11.036,-9.199 11.938,-8.297 11.938,-5.08 11.811,-4.953 10.287,-4.953 10.033,-5.207
  region net VBAT: 7.493,-7.747 10.033,-10.287 10.31,-10.287 10.31,-9.04 9.652,-8.382 9.652,-5.405 9.375,-5.128 7.826,-5.128 7.493,-5.461
  pour cut-out: 5.842,-72.517 5.842,-75.184 4.572,-75.184 4.572,-72.517
  pour cut-out: 6.197,-67.644 6.197,-68.805 7.424,-68.805 7.424,-67.644 6.371,-67.644
  region net VBAT: 20.543,-85.9 23.21,-85.9 24.099,-86.789 24.099,-93.901 22.575,-95.425 19.908,-92.758 19.908,-86.535
  pour cut-out: -6,-16.812 -6,-51.23 -0.17,-51.23 -0.17,-16.812

## Silkscreen, mask and mechanical layers (free items; w line width, h text height)
Bottom Overlay:
  circle w0.203: c-2.921,-85.344 r1.092
  circle w0.203: c22.278,-84.904 r1.092
  region: 10.206,-66.86 10.206,-67.465 11.527,-67.465 11.527,-66.86
  rectangle: 11.616,-76.4 12.221,-75.079
  rectangle: 7.815,-71.321 8.973,-69.406
  rectangle: 11.946,-71.441 13.485,-69.283
  rectangle: -1.524,-95.123 19.812,-88.011
  lines w0.203: -3.721,-85.344 -2.121,-85.344 ; 21.478,-84.904 23.078,-84.904 ; 22.278,-85.704 22.278,-84.104
  text "GND" at 2.179,-24.356 h0.76
  text "VBAT" at 10.18,-25.626 h0.76
  text "DM" at 9.83,-30.912 h0.76
  text "DP" at 9.195,-62.408 h0.76
  text "CC08-1(W305A)-V1.3" at -3.956,-66.802 h1.2 r90
  text "2026-11-18" at -1.914,-71 h1.2 r90
Mechanical 1:
  lines w0.127: 5.999,-12.72 7.999,-12.72 7.999,-10.62 5.999,-10.62 5.999,-12.72
  lines w1: -3.75,-62.69 1.45,-62.69 ; -3.75,-24.99 1.45,-24.99 ; 1.45,-69.94 1.45,-55.44 ; 1.45,-32.24 1.45,-17.74 ; 17.95,-69.94 17.95,-55.44 ; 17.95,-62.69 23.15,-62.69 ; 17.95,-32.24 17.95,-17.74 ; 17.95,-24.99 23.15,-24.99
Mechanical 2:
  lines w0.127: -6,-124 25.4,-124 25.4,-66.64 ccw(c24.4,-66.64) 24.4,-65.64 24.15,-65.64 cw(c24.15,-64.64) 23.15,-64.64 23.15,-60.74 cw(c24.15,-60.74) 24.15,-59.74 24.4,-59.74 ccw(c24.4,-58.74) 25.4,-58.74 25.4,-27.54 ccw(c24.4,-27.54) 24.4,-26.54 24.15,-26.54 cw(c24.15,-25.54) 23.15,-25.54 23.15,-24.44 cw(c24.15,-24.44) 24.15,-23.44 24.4,-23.44 ccw(c24.4,-22.44) 25.4,-22.44 25.4,-6 19.4,0 0,0 -6,-6 -6,-22.44 ccw(c-5,-22.44) -5,-23.44 -4.75,-23.44 cw(c-4.75,-24.44) -3.75,-24.44 -3.75,-25.54 cw(c-4.75,-25.54) -4.75,-26.54 -5,-26.54 ccw(c-5,-27.54) -6,-27.54 -6,-58.74 ccw(c-5,-58.74) -5,-59.74 -4.75,-59.74 cw(c-4.75,-60.74) -3.75,-60.74 -3.75,-64.64 cw(c-4.75,-64.64) -4.75,-65.64 -5,-65.64 ccw(c-5,-66.64) -6,-66.64 -6,-124
  lines w0.15: 13.43,-13.73 ccw(c15.43,-13.73) 17.43,-13.73 ccw(c15.43,-13.73) 13.43,-13.73
Mechanical 3:
  lines w0.127: 25.4,-124 -6,-124 -6,-66.64 cw(c-5,-66.64) -5,-65.64 -4.75,-65.64 ccw(c-4.75,-64.64) -3.75,-64.64 -3.75,-60.74 ccw(c-4.75,-60.74) -4.75,-59.74 -5,-59.74 cw(c-5,-58.74) -6,-58.74 -6,-27.54 cw(c-5,-27.54) -5,-26.54 -4.75,-26.54 ccw(c-4.75,-25.54) -3.75,-25.54 -3.75,-24.44 ccw(c-4.75,-24.44) -4.75,-23.44 -5,-23.44 cw(c-5,-22.44) -6,-22.44 -6,-6 0,0 19.4,0 25.4,-6 ; 25.4,-124 25.4,-66.64 ; 25.4,-124 25.4,-66.64 ; 25.4,-66.64 ccw(c24.4,-66.64) 24.4,-65.64 24.15,-65.64 cw(c24.15,-64.64) 23.15,-64.64 23.15,-60.74 cw(c24.15,-60.74) 24.15,-59.74 24.4,-59.74 ccw(c24.4,-58.74) 25.4,-58.74 ; 25.4,-58.74 25.4,-27.54 ; 25.4,-58.74 25.4,-27.54 ; 25.4,-27.54 ccw(c24.4,-27.54) 24.4,-26.54 24.15,-26.54 cw(c24.15,-25.54) 23.15,-25.54 23.15,-24.44 cw(c24.15,-24.44) 24.15,-23.44 24.4,-23.44 ccw(c24.4,-22.44) 25.4,-22.44 ; 25.4,-22.44 25.4,-6 ; 25.4,-22.44 25.4,-6
  lines w0.15: 6.5,-12.633 ccw(c7,-12.633) 7.5,-12.633 ccw(c7,-12.633) 6.5,-12.633
Mechanical 4:
  lines w0.127: -4.406,-90.779 ccw(c-3.008,-90.779) -1.611,-90.779 -1.611,-88.747 ccw(c-3.008,-88.747) -4.406,-88.747 -4.406,-90.779
  lines w0.381: -4.457,-89.763 -3.008,-89.763 ; -3.008,-92.228 -3.008,-89.763 ; -3.008,-87.299 -3.008,-89.763 ; -1.56,-89.763 -3.008,-89.763
Mechanical 5:
  circle w0.127: c-1.9,-97.08 r1.1
  circle w0.127: c9.7,-74.16 r1.1
  circle w0.127: c9.7,-85.653 r1.1
  circle w0.127: c-1.9,-51.23 r1.1
  circle w0.127: c9.7,-51.23 r1.1
  circle w0.127: c-1.9,-40.68 r1.1
  circle w0.127: c21.3,-30.13 r1.1
  circle w0.127: c9.7,-30.13 r1.1
  circle w0.127: c-1.9,-30.13 r1.1
  circle w0.127: c21.3,-19.58 r1.1
  circle w0.127: c9.7,-19.58 r1.1
  circle w0.127: c-1.9,-19.58 r1.1
  circle w0.127: c21.3,-110.08 r1.1
  circle w0.127: c9.7,-110.08 r1.1
  circle w0.127: c-1.9,-110.08 r1.1
  circle w0.127: c21.3,-97.08 r1.1
  circle w0.127: c9.7,-97.08 r1.1
  circle w0.127: c21.3,-7.58 r1.1
  circle w0.127: c21.193,-73.78 r1.1
  circle w0.127: c-1.787,-73.78 r1.1
  circle w0.127: c9.7,-62.667 r1.1
  circle w0.127: c21.3,-51.23 r1.1
  circle w0.127: c21.3,-40.68 r1.1
  circle w0.127: c9.7,-40.68 r1.1
  circle w0.127: c-1.9,-7.58 r1.1
  lines w0.127: -4.278,-90.779 ccw(c-3.008,-90.779) -1.738,-90.779 -1.738,-88.747 ccw(c-3.008,-88.747) -4.278,-88.747 -4.278,-90.779 ; 7.795,-9.199 7.795,-6.899 9.065,-6.899 9.065,-9.199 7.795,-9.199 ; 10.335,-9.199 10.335,-6.899 11.605,-6.899 11.605,-9.199 10.335,-9.199 ; 21.172,-90.779 ccw(c22.442,-90.779) 23.712,-90.779 23.712,-88.747 ccw(c22.442,-88.747) 21.172,-88.747 21.172,-90.779